# Altium PCB WIFI_BoardV4.10.PcbDoc (part 1 of 4)
Units mil, origin at the board's own origin, x right, y up, seen from the top; angles counter-clockwise.
Board outline 5550.17 x 2342.16 mil, 2 copper layers (Top Layer, Bottom Layer), stack 61.811 mil thick; 125 components, 90 nets, 434 pads, 155 vias.
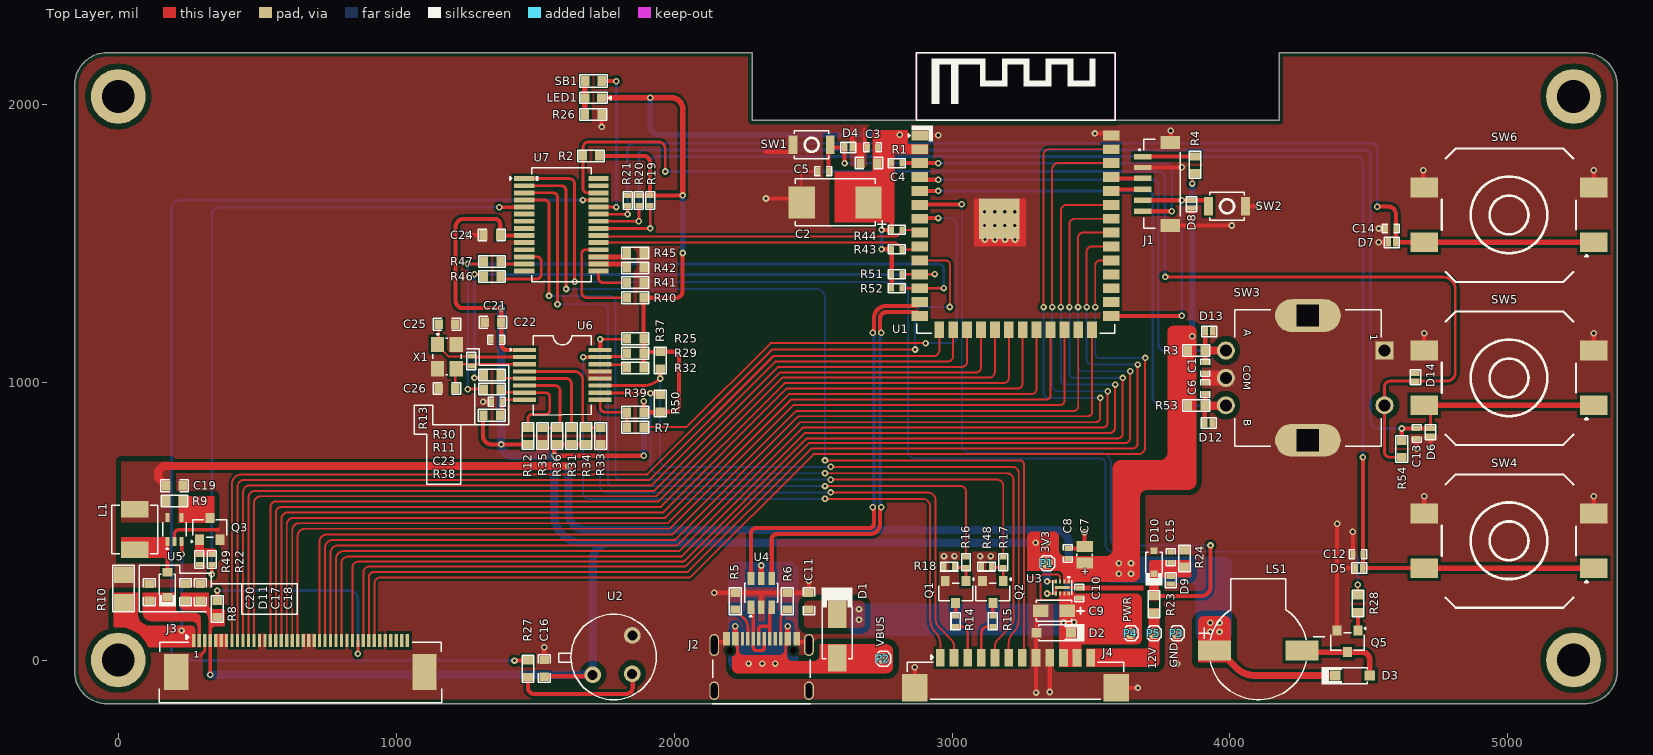
[diagram p0: Top Layer view]
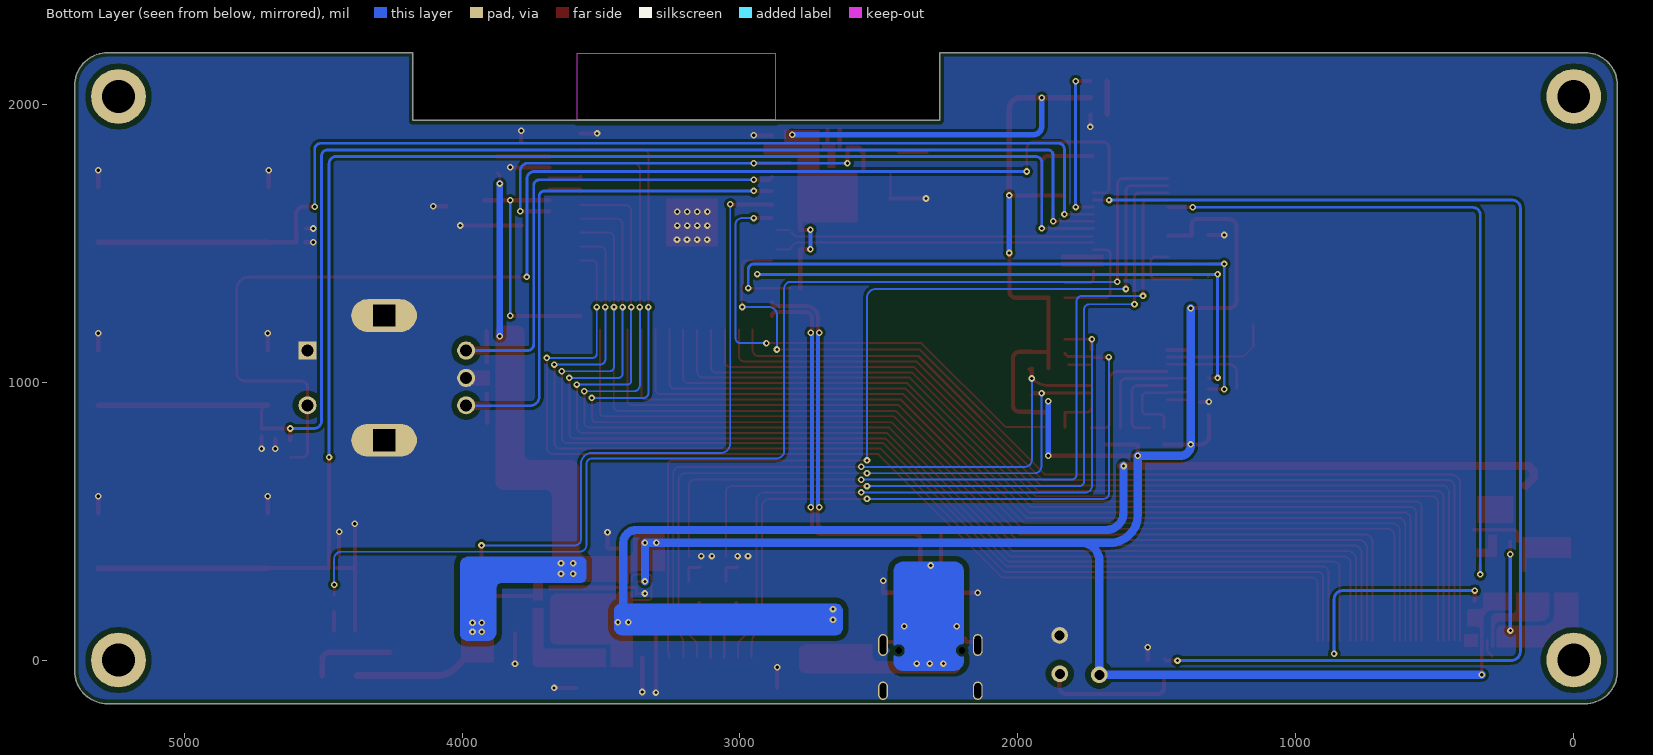
[diagram p1: Bottom Layer view, seen from below]
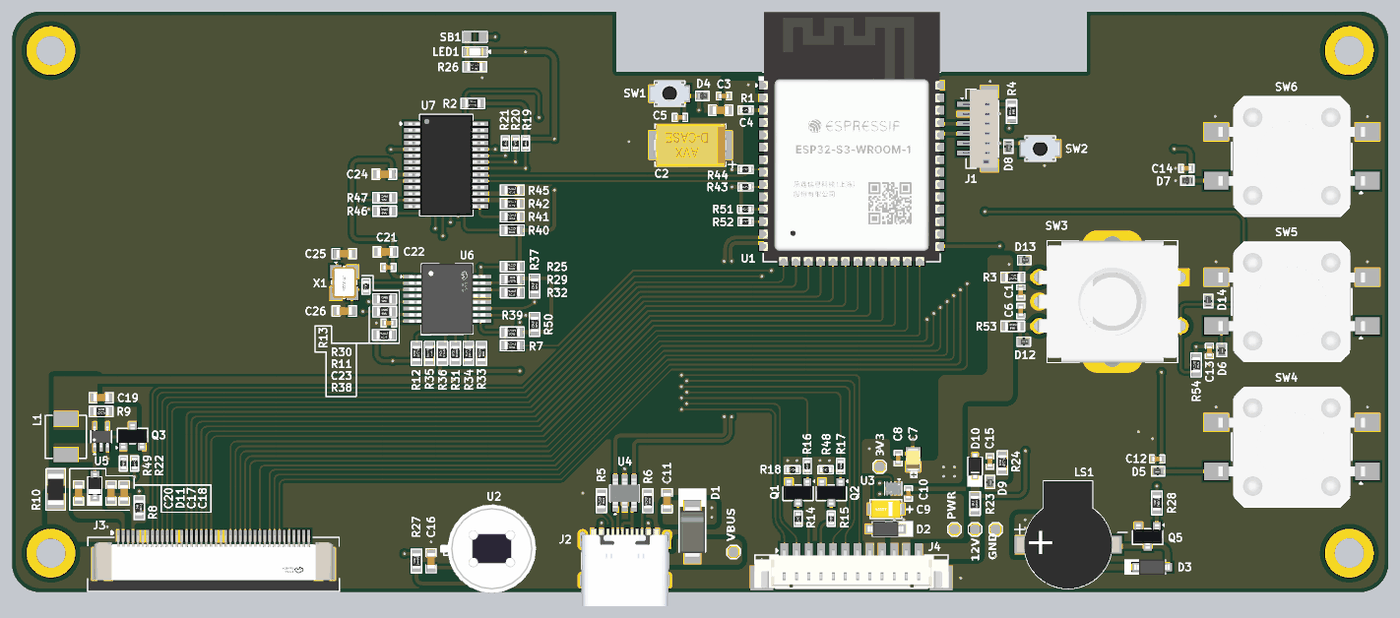
[diagram p3: 3D render of the assembled board from above, using the file's embedded part models]

## Layer stack, top to bottom
Top Solder: solder mask 0.394, Solder Resist, Dk 3.5
Top Layer: signal copper 1.378
Dielectric 1: dielectric 59.055, FR-4, Dk 4.6
Bottom Layer: signal copper 1.378
Bottom Solder: solder mask 0.394, Solder Resist, Dk 3.5

## Board outline
-156.47,-41.36 -156.47,2071.73 -156.47,2068.66 cw(c-40.09,2068.66) -40.09,2185.04 2280.48,2185.04 2280.48,1941.42 4177.38,1941.42 4177.38,2185.04 5275.59,2185.04 cw(c5275.59,2066.93) 5393.7,2066.93 5393.7,-39.63 cw(c5276.21,-39.63) 5276.21,-157.12 -40.71,-157.12 cw(c-40.71,-41.36)

## Design rules (kind name [scope] priority, off if disabled: settings)
BoardOutlineClearance [All] p1: gap=0 ignorepadtopadclearanceinfootprint=FALSE except(10: Arc-OutlineEdge; 15: Poly-OutlineEdge)
Clearance [All] p1: gap=10 ignorepadtopadclearanceinfootprint=FALSE except(4: SMDPad-SMDPad; 6: Arc-SMDPad Track-SMDPad SMDPad-Hole; 7: Arc-Arc Arc-Track Arc-Fill Arc-Region Track-Track Track-Via Track-Fill Track-Region Track-Text SMDPad-Fill SMDPad-Region THPad-THPad Via-Via Via-Region Fill-Fill Fill-Region Region-Region; 20: THPad-Poly Fill-Poly Poly-Poly Poly-Region)
ComponentClearance [All] p1: gap=0 collisioncheckmode=3 verticalgap=0 showdistances=FALSE
DiffPairsRouting Diff_USB [All] p1: maxlimit=7 minlimit=7 mostfreqgap=7 toplayer_minwidth=15 toplayer_maxwidth=15 toplayer_prefwidth=15 bottomlayer_minwidth=15 bottomlayer_maxwidth=15 bottomlayer_prefwidth=15 impedanceprofiledriven=TRUE impedanceprofileid={7E0B47CC-6290-4BF2-9677-D2EBC84C2973} impedanceprofilevalue=90.000000 maxuncoupledlength=500
HoleSize [All] p1: absolutevalues=TRUE maxlimit=137.8 minlimit=1 maxpercent=80.000 minpercent=20.000
MatchedLengths [InDifferentialPairClass('DIFF_485')] p1: tolerance=1000 checknetsindiffpair=TRUE checkdiffpairvsdiffpair=FALSE checkxsignals=FALSE checkothers=FALSE
MinimumSolderMaskSliver [All] p1: minsoldermaskwidth=0
PolygonConnect [All] p1: connectstyle=Direct reliefconductorwidth=10 reliefentries=4 polygonreliefangle="90 Angle" airgapwidth=10
RoutingVias [All] p1: holewidth=11.81 width=23.62 viastyle="Through Hole" minholewidth=7.87 minwidth=15.75 maxholewidth=23.62 maxwidth=39.37
SilkToSilkClearance [All] p1: silktosilkclearance=0
SilkToSolderMaskClearance [IsPad] p1: minsilkscreentomaskgap=0 clearancetoexposedcopper=TRUE
SolderMaskExpansion [All] p1: expansion=4 istentingtop=FALSE
SupplyNets "Schematic Supply Nets_5" [InNet('3V3_WIFI')] p1: voltage=0.000
SupplyNets "Schematic Supply Nets_3" [InNet('PWR')] p2: voltage=0.000
SupplyNets "Schematic Supply Nets_2" [InNet('U_VBUS')] p3: voltage=0.000
SupplyNets "Schematic Supply Nets_1" [InNet('VCC_12V')] p4: voltage=0.000
SupplyNets "Schematic Supply Nets_7" [InNet('GND')] p5: voltage=0.000
Width [All] p1: maxlimit=100 minlimit=4 preferedwidth=6 minimp=50.000000 maximp=50.000000 favimp=50.000000
24 further rules are at their usual default settings.

## Classes and differential pairs
component class IO_Expander_Sheet: C21 C22 C23 C24 C25 C26 J4 Q1 Q2 R11 R12 R13 R14 R15 R16 R17 R18 R25 R29 R30 R31 R32 R33 R34 R35 R36 R37 R38 R39 R40 R41 R42 R43 R44 R45 R46 R47 R48 R50 R51 R52 U6 U7 X1
differential pair class USB_PROG_LINES: TYPEC USBD
net class USB_PROG: TYPEC_N TYPEC_P
component class WiFI_Sheet: C1 C2 C3 C4 C5 C6 C7 C8 C9 C10 C11 C12 C13 C14 C15 C16 C17 C18 C19 C20 D1 D2 D3 D4 D5 D6 D7 D8 D9 D10 D11 D12 D13 D14 J1 J2 J3 L1 LED1 LS1 P1 P2 P3 P4 P5 Q3 Q5 R1 R2 R3 R4 R5 R6 R7 R8 R9 R10 R19 R20 R21 R22 R23 R24 R26 R27 R28 R49 R53 R54 SB1 SW1 SW2 SW3 SW4 SW5 SW6 U1 U2 U3 U4 U5
differential pair TYPEC: +TYPEC_P -TYPEC_N

## Components (designator, comment, footprint, x,y, rotation, side; value= is the part's Value field where it differs from the comment)
C1 "0.01uF" Cap-0402 3911.4,1051.47 r90 top
C2 "47uF" Case-D 2579.31,1646.42 r180 top
C3 "100nF" Cap-0402 2713.99,1844.53 r0 top
C4 "22uF" Cap-0603 2700.99,1787.71 r0 top
C5 "1uF" Cap-0402 2536.86,1758 r0 top
C6 "0.01uF" Cap-0402 3911.4,977.34 r270 top
C7 "22uF" Tant-0805 3476.96,378.14 r90 top
C8 "0.1uF" Cap-0402 3416.96,383.11 r270 top value=100nF
C9 "10uF" Case-A 3367.31,177.89 r180 top
C10 "0.1uF" Cap-0402 3457.99,240.84 r270 top value=100nF
C11 "100nF" Cap-0603 2485.04,211.75 r270 top
C12 "100nF" Cap-0402 4460.69,380.2 r0 top
C13 "100nF" Cap-0402 4671.9,815.22 r90 top
C14 "100nF" Cap-0402 4578.8,1552.55 r0 top
C15 "0.1uF" Cap-0402 3787.06,370.09 r270 top
C16 "0.1uF" Cap-0603 1532.99,-30.18 r90 top
C17 "4.7uF" Cap-0603 242.33,243.39 r270 top
C18 "100nF" Cap-0603 295.48,243.39 r270 top
C19 "4.7uF" Cap-0603 202.69,627.17 r180 top
C20 "1uF" Cap-0603 111.6,243.39 r270 top
C21 "1uF" Cap-0603 1348.34,1215.23 r0 top
C22 "0.1uF" Cap-0402 1360.34,1152.73 r0 top value=100nF
C23 "0.1uF" Cap-0402 1362.34,928.78 r0 top value=100nF
C24 "100nF" Cap-0603 1344.34,1529.24 r180 top
C25 "22pF" Cap-0603 1182.97,1208.23 r180 top
C26 "22pF" Cap-0603 1182.97,976.79 r0 top
D1 "SS24A" SMA 2586.76,85.89 r270 top
D2 "MMSZ5234B-7-F" SOD-123 3365.98,97.89 r0 top
D3 "1N4148W-7-F" SOD-123 4440.47,-56 r180 top value=2pF
D4 "LESD8D3.3CAT5G" "SOD-882 Bi Directional" 2627.21,1844.53 r180 top
D5 "LESD8D3.3CAT5G" "SOD-882 Bi Directional" 4464.69,330.55 r0 top
D6 "LESD8D3.3CAT5G" "SOD-882 Bi Directional" 4721.47,819.22 r90 top
D7 "LESD8D3.3CAT5G" "SOD-882 Bi Directional" 4582.8,1502.97 r0 top
D8 "LESD8D3.3CAT5G" "SOD-882 Bi Directional" 3861.48,1640.16 r90 top
D9 "LESD8D3.3CAT5G" "SOD-882 Bi Directional" 3787.06,287.32 r90 top
D10 "MM3Z3V3B" SOD323F 3726.76,351.44 r270 top
D11 "NSR0240HT1G" SOD-323 177.1,270.9 r90 top value=4pF
D12 "LESD8D3.3CAT5G" "SOD-882 Bi Directional" 3923.17,853 r180 top
D13 "LESD8D3.3CAT5G" "SOD-882 Bi Directional" 3925.17,1182.61 r180 top
D14 "LESD8D3.3CAT5G" "SOD-882 Bi Directional" 4667.01,1017.32 r270 top
J1 "Voltlink Target" "Voltlink Target" 3735.7,1713 r270 top
J2 "TYPE-C-31-M-12" TYPE-C-31-M-12_ 2314.76,-17.11 r0 top locked
J3 "AFC07-S40FCA-00" AFC07-S40FCA-00 655.85,13.27 r0 top
J4 "HC-1.25-12PLT" HC-1.25-12PLT 3228.53,-46.02 r0 top
L1 "4.7uH" MWSA0402S-4R7MT 60.05,469.54 r270 top
LED1 "ALS-PT19-315C/L177/TR8" ALS-PT19-315C/L177/TR_ 1709.89,2022.89 r180 top
LS1 "YS-SBZ9032C03R16" YS-SBZ9032C03R16_ 4102.03,34.13 r0 top
P1 "TEST POINT 0.5mm Dia" "Test-point - 0.5mm" 3341.88,348.79 r0 top
P2 "TEST POINT 0.5mm Dia" "Test-point - 0.5mm" 2752.99,4.74 r0 top
P3 "TEST POINT 0.5mm Dia" "Test-point - 0.5mm" 3809.51,95.89 r0 top
P4 "TEST POINT 0.5mm Dia" "Test-point - 0.5mm" 3643.99,95.89 r0 top
P5 "TEST POINT 0.5mm Dia" "Test-point - 0.5mm" 3726.75,95.89 r0 top
Q1 "BSS138" sot-23 3013.07,244.42 r180 top
Q2 "BSS138" SOT-23 3146.97,244.42 r180 top
Q3 "AO3400A" Sot-23 329.5,472.14 r0 top
Q5 "MMBT5551" SOT-23 4422.99,67.5 r180 top
R1 "10K" Res-0402 2801.49,1787.71 r180 top
R2 "10K" Res-0603 1701.41,1814 r180 top value=10kR
R3 "10K" Res-0603 3878.83,1113.4 r180 top value=10kR
R4 "0R" Res-0603 3874.4,1781.9 r90 top
R5 "5.1K" Res-0603 2220.28,211.75 r90 top
R6 "5.1K" Res-0603 2407.35,211.75 r90 top
R7 "0R" Res-0603 1860.52,837.67 r0 top
R8 "10K" Res-0603 356.55,183.39 r270 top
R9 "10K" Res-0603 202.69,571.9 r180 top
R10 "6.2R" Res-1206 19.6,257.11 r270 top
R11 "0R" Res-0603 1345.34,974.7 r0 top
R12 "DNP" Res-0603 1474.75,805.76 r270 top
R13 "1M" Res-0402 1270.47,1075.78 r270 top value=1MR
R14 "100R" Res-0402 3013.07,139.3 r270 top
R15 "0R" Res-0402 3146.97,139.3 r270 top
R16 "1K" Res-0402 3050.47,351.44 r90 top
R17 "1K" Res-0402 3184.37,351.44 r90 top
R18 "47K" Res-0402 2990.17,336.44 r0 top
R19 "10K" Res-0402 1914,1653 r90 top
R20 "10K" Res-0402 1873.41,1653 r90 top
R21 "10K" Res-0402 1832.82,1653 r90 top
R22 "4.7K" Res-0402 337.09,361.99 r270 top
R23 "15K" Res-0603 3726.76,200.51 r270 top value=15kR
R24 "3.3K" Res-0603 3836.92,365.09 r270 top
R25 "10K" Res-0603 1860.52,1156.23 r0 top value=10kR
R26 "4.7K" Res-0603 1709.41,1962.89 r0 top
R27 "20K" Res-0603 1474.35,-31.34 r270 top
R28 "4.7K" Res-0603 4460.39,202.89 r270 top
R29 "100K" Res-0603 1860.52,1103.72 r180 top value=100kR
R30 "0R" Res-0603 1345.34,1025.76 r0 top
R31 "DNP" Res-0603 1631.06,805.76 r270 top
R32 "10K" Res-0603 1860.53,1051.21 r0 top value=10kR
R33 "0R" Res-0603 1736.19,805.76 r90 top
R34 "0R" Res-0603 1683.53,805.76 r270 top
R35 "0R" Res-0603 1526.73,805.76 r90 top
R36 "0R" Res-0603 1579.03,805.76 r270 top
R37 "10K" Res-0603 1950,1078.21 r90 top value=10kR
R38 "10K" Res-0603 1344.33,880.55 r0 top value=10kR
R39 "5.1K" Res-0603 1860.53,891.38 r0 top
R40 "10K" Res-0603 1860.53,1303.23 r0 top
R41 "10K" Res-0603 1860.53,1357.72 r0 top
R42 "10K" Res-0603 1860.53,1411.04 r0 top
R43 "4.7K" Res-0402 2801.49,1477.71 r180 top
R44 "4.7K" Res-0402 2801.49,1547.72 r180 top
R45 "10K" Res-0603 1860.53,1464.37 r0 top
R46 "0R" Res-0603 1345.34,1380 r0 top
R47 "0R" Res-0603 1345.34,1434.15 r0 top
R48 "47K" Res-0402 3124.07,336.44 r0 top
R49 "100K" Res-0402 292.09,361.99 r90 top
R50 "DNP" Res-0603 1950,923.38 r90 top value=100kR
R51 "4.7K" Res-0402 2801.01,1387.71 r180 top
R52 "4.7K" Res-0402 2801.49,1337.71 r180 top
R53 "10K" Res-0603 3878.83,915.5 r0 top value=10kR
R54 "DNP" Res-0603 4618.07,759.5 r90 top
SB1 "Solder Bridge 0603" "Solder Bridge" 1710.37,2082.89 r180 top
SW1 "B3U-1000P" B3U-1000P 2495.06,1853.8 r180 top
SW2 "B3U-1000P" B3U-1000P 3989.6,1632.53 r0 top
SW3 "PEC11R-4215F-S0024" PEC11R-4215F-S0024 4280.58,1014.97 r270 top
SW4 "TL3300CF160Q" TL3300CF160Q. 5004.1,428.97 r180 top
SW5 "TL3300CF160Q" TL3300CF160Q. 5004.1,1015.19 r180 top
SW6 "TL3300CF160Q" TL3300CF160Q. 5004.1,1601.4 r180 top
U1 "ESP32-S3-WROOM-1-N16R8" "41-SMD Module" 3229.12,1538.11 r0 top locked
U2 "AS312" AS312 1812.99,-16.8 r45 top
U3 "LD56100DPU33R" DFN-8(1.2x1.6) 3396.62,260.84 r270 top
U4 "USBLC6-2SC6" SOT-23-6 2313.79,241.97 r90 top
U5 "TPS61169DCKR" SC70-5 202.69,469.58 r90 top
U6 "WK2132-ISSG" SSOP-16-208mil 1598.34,1025.76 r0 top
U7 "MCP23017T-E/SS" SSOP-28-208mil 1594.49,1565.75 r0 top
X1 "14.7456MHz" SMD3225-4P 1182.97,1091.84 r270 top

## Footprints (in the part's own frame and the unit in brackets; to place one, negate y for a bottom-side part, rotate by r counter-clockwise, add the part's x,y. Pads: shape width x height; smd on the part's side, far side on the other; paste and mask are expansions set on the pad)
"41-SMD Module" [mm]
  rect 1.5x0.9 smd: 1(-8.75,8.88) 2(-8.75,7.61) 3(-8.75,6.34) 4(-8.75,5.07) 5(-8.75,3.8) 6(-8.75,2.53) 7(-8.75,1.26) 8(-8.75,-0.01) 9(-8.75,-1.28) 10(-8.75,-2.55) 11(-8.75,-3.82) 12(-8.75,-5.09) 13(-8.75,-6.36) 14(-8.75,-7.63) 27(8.75,-7.63) 28(8.75,-6.36) 29(8.75,-5.09) 30(8.75,-3.82) 31(8.75,-2.55) 32(8.75,-1.28) 33(8.75,-0.01) 34(8.75,1.26) 35(8.75,2.53) 36(8.75,3.8) 37(8.75,5.07) 38(8.75,6.34) 39(8.75,7.61) 40(8.75,8.88)
  rect 0.9x1.5 smd: 15(-6.98,-8.88) 16(-5.71,-8.88) 17(-4.44,-8.88) 18(-3.17,-8.88) 19(-1.9,-8.88) 20(-0.63,-8.88) 21(0.64,-8.88) 22(1.91,-8.88) 23(3.18,-8.88) 24(4.45,-8.88) 25(5.72,-8.88) 26(6.99,-8.88)
  rect 3.7x3.7 smd: 41(-1.5,1.26)
  Keep-Out Layer region: -9.042,10.287 9.042,10.287 9.042,16.383 -9.042,16.383
  silkscreen extent -9.8,-9.2 9.09,16.43, body extent -9.01,-9.14 9.01,16.37, height 3.16
AFC07-S40FCA-00 [mm]
  rect 0.3x1.2 smd: 1(-9.751,1.443) 2(-9.252,1.443) 3(-8.753,1.443) 4(-8.252,1.443) 5(-7.752,1.443) 6(-7.252,1.443) 7(-6.751,1.443) 8(-6.251,1.443) 9(-5.753,1.443) 10(-5.253,1.443) 11(-4.752,1.443) 12(-4.252,1.443) 13(-3.752,1.443) 14(-3.251,1.443) 15(-2.752,1.443) 16(-2.253,1.443) 17(-1.753,1.443) 18(-1.252,1.443) 19(-0.752,1.443) 20(-0.251,1.443) 21(0.249,1.443) 22(0.748,1.443) 23(1.247,1.443) 24(1.748,1.443) 25(2.248,1.443) 26(2.748,1.443) 27(3.249,1.443) 28(3.749,1.443) 29(4.247,1.443) 30(4.747,1.443) 31(5.248,1.443) 32(5.748,1.443) 33(6.248,1.443) 34(6.749,1.443) 35(7.248,1.443) 36(7.747,1.443) 37(8.247,1.443) 38(8.748,1.443) 39(9.248,1.443) 40(9.749,1.443)
  rect 2.2x3.3 smd: MP1(-11.35,-1.443) MP2(11.35,-1.443)
  silkscreen extent -12.9,-4.25 12.9,1.91, body extent -12.8,-4.17 12.8,1.58, height 2.01
ALS-PT19-315C/L177/TR_ [mm]
  rect 0.82x0.82 smd: 1(-0.75,0) 2(0.75,0)
  silkscreen extent -1.57,-0.51 1.27,0.51, body extent -0.85,-0.4 0.85,0.4, height 0.6
AS312 [mil]
  round 60 hole 36 paste-99999 mask+2: 1(-100.4,48.95) 2(2.6,-48.95) 3(100.4,48.35)
  silkscreen extent -156,-113 152,195, body extent -179,-130 179,228, height 177
B3U-1000P [mm] "SWITCH TACTILE SPST-NO 0.05A 12V"
  rect 0.82x1.72 smd: 1(-1.7,0) 2(1.7,0)
  silkscreen extent -1.57,-1.3 1.57,1.3, body extent -2,-1.26 2,1.24, height 1.6
Cap-0402 [mil]
  rect 18x25 smd mask+2.36: 1(-18.5,0) 2(18.5,0)
  silkscreen extent -31,-16 31,16, body extent -20,-10 20,10, height 19
Cap-0603 [mil]
  rect 30x35 smd mask+2.36: 1(-30,0) 2(30,0)
  silkscreen extent -49,-21 49,21, body extent -32,-16 31,16, height 34
Case-A [mm]
  rect 1.42x1.13 smd: 1(-1.2,0) 2(1.2,0)
  silkscreen extent -2.72,-0.97 1.63,0.97, body extent -1.6,-0.9 1.6,0.9, height 1.8
Case-D [mm]
  rect 2.4x2.9 smd: 1(-3.05,0) 2(3.05,0)
  silkscreen extent -4.7,-2.15 3.65,2.39, body extent -3.7,-2.22 3.7,2.22, height 3.01
DFN-8(1.2x1.6) [mm]
  rect 0.345x0.2 smd paste+0 mask+0.051: 1(-0.547,0.6) 2(-0.547,0.2) 3(-0.547,-0.2) 4(-0.547,-0.6) 5(0.547,-0.6) 6(0.547,-0.2) 7(0.547,0.2) 8(0.547,0.6)
  rect 0.3x1.3 smd paste+0 mask+0.051: 9(0,0)
  silkscreen extent -0.98,-0.88 0.68,0.88, body extent -0.61,-0.81 0.61,0.81, height 0.4
HC-1.25-12PLT [mm]
  rect 0.8x1.62 smd paste+0 mask+0.05: 1(-6.875,1.38) 2(-5.625,1.38) 3(-4.375,1.38) 4(-3.125,1.38) 5(-1.875,1.38) 6(-0.625,1.38) 7(0.625,1.38) 8(1.875,1.38) 9(3.125,1.38) 10(4.375,1.38) 11(5.625,1.38) 12(6.875,1.38)
  rect 2.35x2.5 smd paste+0 mask+0.05: MP1(-9.2,-1.38) MP2(9.2,-1.38)
  silkscreen extent -9.91,-2.42 9.91,1.66, body extent -9.97,-2.38 9.97,1.52, height 4.75
MWSA0402S-4R7MT [mm]
  rect 1.5x2.5 smd: 1(-1.85,0) 2(1.85,0)
  silkscreen extent -2.2,-2.1 2.2,2.1
PEC11R-4215F-S0024 [mm]
  rect 1.65x1.65 hole 1.1: 1(-2.5,7)
  round 1.65 hole 1.1: 2(2.5,7) A(-2.5,-7.5) B(2.5,-7.5) COM(0,-7.5)
  oval 3x6 hole 2 square: S1(-5.7,0) S2(5.7,0)
  silkscreen extent -6.25,-6.7 6.25,6.7, body extent -6.93,-7.6 6.93,7.1, height 21.5
Res-0402 [mil]
  rect 18x25 smd mask+2.17: 1(-18.5,0) 2(18.5,0)
  silkscreen extent -32,-17 32,16, body extent -23,-11 23,11, height 16
Res-0603 [mil]
  rect 30x35 smd: 1(-30,0) 2(30,0)
  silkscreen extent -48,-21 48,21, body extent -31,-17 31,17, height 18
Res-1206 [mil]
  rect 60x70 smd: 1(-50,0) 2(50,0)
  silkscreen extent -84,-39 84,39, body extent -63,-31 63,31, height 24
SC70-5 [mm]
  rect 0.85x0.35 smd: 1(-1.1,0.65) 2(-1.1,0) 3(-1.1,-0.65) 4(1.1,-0.65) 5(1.1,0.65)
  silkscreen extent -1.8,-1.07 0.64,1.07, body extent -1.05,-1 1.05,1, height 1.1
SMA [mm]
  rect 2.5x1.7 smd: 1(-2,0) 2(2,0)
  silkscreen extent -4.45,-1.42 2.06,1.42, body extent -2.6,-1.3 2.6,1.3, height 2.4
SMD3225-4P [mm]
  rect 1.4x1.2 smd: 1(-1.1,-0.85) 2(1.1,-0.85) 3(1.1,0.85) 4(-1.1,0.85)
  silkscreen extent -2.08,-1.3 1.65,1.3, body extent -1.6,-1.25 1.6,1.25, height 0.81
SOD323F [mm]
  rect 0.6x0.6 smd: 1(-1.05,0) 2(1.05,0)
  silkscreen extent -0.91,-0.79 2.11,0.79, body extent -1.25,-0.68 1.25,0.68, height 1
SOD-123 [mm]
  rect 0.95x0.9 smd: 1(-1.575,0) 2(1.575,0)
  silkscreen extent -1.37,-0.8 2.82,0.8, body extent -1.82,-0.78 1.83,0.78, height 1.5
SOD-323 [mm]
  rect 0.8x0.9 smd mask+0.055: 1(-1.15,0) 2(1.15,0)
  silkscreen extent -2.01,-0.79 0.94,0.79, body extent -1.3,-0.67 1.3,0.67, height 1.1
"SOD-882 Bi Directional" [mm]
  rect 0.5x0.8 smd mask+0.055: 1(-0.35,0) 2(0.35,0)
  silkscreen extent -0.69,-0.48 0.69,0.48, body extent -0.49,-0.29 0.49,0.29, height 0.48
"Solder Bridge" [mil] "Solder Bridge ON"
  rect 30x35 smd: 1(-30,0) 2(30,0)
  silkscreen extent -50,-22 50,22
sot-23 [mm] "TRANS NPN 40V 0.6A SOT23"
  rect 0.82x0.92 smd: 1(-0.95,-1) 2(0.95,-1) 3(0,1)
  silkscreen extent -1.68,-1.3 1.55,0.81, body extent -1.5,-1.25 1.5,1.25, height 1.05
SOT-23 [mm] "TRANS NPN 40V 0.6A SOT23"
  rect 0.82x0.92 smd: 1(-0.95,-1) 2(0.95,-1) 3(0,1)
  silkscreen extent -1.68,-1.3 1.55,0.81, body extent -1.5,-1.25 1.5,1.25, height 1.05
Sot-23 [mm] "TRANS NPN 40V 0.6A SOT23"
  rect 0.82x0.92 smd: 1(-0.95,-1) 2(0.95,-1) 3(0,1)
  silkscreen extent -1.68,-1.3 1.55,0.81, body extent -1.5,-1.25 1.5,1.25, height 1.05
SOT-23-6 [mm]
  rect 1.22x0.62 smd: 1(-1.31,0.95) 2(-1.31,0) 3(-1.31,-0.95) 4(1.31,-0.95) 5(1.31,0) 6(1.31,0.95)
  silkscreen extent -2.18,-1.52 0.86,1.52, body extent -1.5,-1.5 1.5,1.5, height 1.47
SSOP-16-208mil [mm]
  rect 2.1x0.38 smd paste+0 mask+0.051: 1(-3.45,2.275) 2(-3.45,1.625) 3(-3.45,0.975) 4(-3.45,0.325) 5(-3.45,-0.325) 6(-3.45,-0.975) 7(-3.45,-1.625) 8(-3.45,-2.275) 9(3.45,-2.275) 10(3.45,-1.625) 11(3.45,-0.975) 12(3.45,-0.325) 13(3.45,0.325) 14(3.45,0.975) 15(3.45,1.625) 16(3.45,2.275)
  silkscreen extent -4.75,-3.68 2.65,3.6, body extent -3.9,-3.6 3.9,3.6, height 2.2
SSOP-28-208mil [mm]
  rect 1.85x0.45 smd: 1(-3.4,4.225) 2(-3.4,3.575) 3(-3.4,2.925) 4(-3.4,2.275) 5(-3.4,1.625) 6(-3.4,0.975) 7(-3.4,0.325) 8(-3.4,-0.325) 9(-3.4,-0.975) 10(-3.4,-1.625) 11(-3.4,-2.275) 12(-3.4,-2.925) 13(-3.4,-3.575) 14(-3.4,-4.225) 15(3.4,-4.225) 16(3.4,-3.575) 17(3.4,-2.925) 18(3.4,-2.275) 19(3.4,-1.625) 20(3.4,-0.975) 21(3.4,-0.325) 22(3.4,0.325) 23(3.4,0.975) 24(3.4,1.625) 25(3.4,2.275) 26(3.4,2.925) 27(3.4,3.575) 28(3.4,4.225)
  silkscreen extent -4.7,-5.21 2.72,5.21, body extent -3.88,-5.17 3.88,5.17, height 2.15
Tant-0805 [mm]
  rect 1x1.5 smd: 1(-0.75,0) 2(0.75,0)
  silkscreen extent -0.1,-0.7 0.1,0.7, body extent -1.1,-0.72 1.1,0.72, height 1.24
"Test-point - 0.5mm" [mm]
  oct 1x1 smd: 1(0,0)
  silkscreen extent -0.68,-0.68 0.68,0.68
TL3300CF160Q. [mm] "SWITCH TACTILE SPST-NO 0.05A 12V"
  rect 2.5x1.8 smd: 1(-7.75,2.5) 2(7.75,2.5) 3(-7.75,-2.5) 4(7.75,-2.5)
  silkscreen extent -7.21,-6.07 6.15,6.12, body extent -7.5,-5.98 7.5,6.02, height 8.77
TYPE-C-31-M-12_ [mm]
  rect 0.6x1.2 smd: A1/B12(-3.2,2.375) A4/B9(-2.4,2.375) B1/A12(3.2,2.375) B4/A9(2.4,2.375)
  rect 0.3x1.2 smd: A5(-1.25,2.375) A6(-0.25,2.375) A7(0.25,2.375) A8(1.25,2.375) B5(1.75,2.375) B6(0.75,2.375) B7(-0.75,2.375) B8(-1.75,2.375)
  round 0 hole 0.62 unplated: MH(-2.89,1.305) MH(2.89,1.305)
  oval 0.9x2 hole 0.6 slot 1.7 at 90 deg: S1(4.325,1.805) S4(-4.325,1.805)
  oval 0.9x1.7 hole 0.6 slot 1.4 at 90 deg: S2(4.325,-2.375) S3(-4.325,-2.375)
  silkscreen extent -4.5,-3.57 4.5,0.44, body extent -4.47,-5.01 4.47,2.89, height 3.31
"Voltlink Target" [mm]
  rect 0.5x1.6 smd: 1(-2.5,-1.262) 2(-1.5,-1.262) 3(-0.5,-1.262) 4(0.5,-1.262) 5(1.5,-1.262) 6(2.5,-1.262)
  rect 1.2x1.8 smd: MP1(-3.8,1.262) MP2(3.8,1.262)
  silkscreen extent -4.06,-1.68 4.06,2.17, body extent -4,-1.49 4,2.11, height 4.25
YS-SBZ9032C03R16_ [mm] "NO 2700Hz 85dB @ 3V, 10cm 3V F9mm SMD,9x3.2mm Buzzers RoHS"
  rect 3x1.8 smd: 1(-4,0) 2(4,0)
  silkscreen extent -5.46,-4.5 6.06,6.54, body extent -5.25,-4.5 5.25,6.5, height 3.3

## Part data
C1 C6: library part CC0402KRX5R8BB103, "CAP CER 10000PF 25V X5R 0402", LCSC Part Number=C576726, Manufacturer=Yageo, Supplier Part Number 1=2101932, Category="Ceramic Capacitors", ComponentLink1Description=LCSC, ComponentLink1URL=https://www.lcsc.com/product-detail/Multilayer-Ceramic-Capacitors-MLCC-SMD-SMT_YAGEO-CC0402KRX5R8BB103_C576726.html, Item Type=Capacitor, Manufacturer Part Number=CC0402KRX5R8BB103, Pricing 1="10000=0.00290, 40000=0.00270, 150000=0.00260, 250000=0.00250, 500000=0.00240 (USD)", RoHS=Yes, RoHS Compliant=Yes, Stock 1=140000, Supplier 1="Future Electronics"
C2: library part T495D476K025ATE250, "CAP TANT 47UF 10% 25V 2917", LCSC Part Number=C1952924, Manufacturer=KEMET, ComponentLink1Description=http://www.mouser.com/ds/2/212/KEM_T2071_T495_COTS-1104607.pdf?src-supplier=Mouser, ComponentLink1URL=http://www.mouser.com/ds/2/212/KEM_T2071_T495_COTS-1104607.pdf?src-supplier=Mouser, ComponentLink2Description=http://components.arrow.com/part/dataview/43511451S7939771N7429?src-supplier=Arrow+Electronics, ComponentLink2URL=http://components.arrow.com/part/dataview/43511451S7939771N7429?src-supplier=Arrow+Electronics, ComponentLink3Description=https://datasheet.octopart.com/T495D476K025ATE250-Kemet-datasheet-27203288.pdf?src-supplier=Element14, ComponentLink3URL=https://datasheet.octopart.com/T495D476K025ATE250-Kemet-datasheet-27203288.pdf?src-supplier=Element14, ComponentLink4Description=https://datasheet.octopart.com/T495D476K025ATE250-Kemet-datasheet-9873475.pdf?src-supplier=Newark, ComponentLink4URL=https://datasheet.octopart.com/T495D476K025ATE250-Kemet-datasheet-9873475.pdf?src-supplier=Newark, ComponentLink5Description=http://www.kemet.com/Lists/ProductCatalog/Attachments/261/KEM_T2009_T495.pdf?src-supplier=Avnet, ComponentLink5URL=http://www.kemet.com/Lists/ProductCatalog/Attachments/261/KEM_T2009_T495.pdf?src-supplier=Avnet, ComponentLink6Description=https://api.kemet.com/component-edge/download/datasheet/T495D476K025ATE250.pdf?src-supplier=Digikey, ComponentLink6URL=https://api.kemet.com/component-edge/download/datasheet/T495D476K025ATE250.pdf?src-supplier=Digikey, ComponentLink7Description=https://datasheet.octopart.com/T495D476K025ATE250-KEMET-datasheet-102476631.pdf?src-supplier=Farnell, ComponentLink7URL=https://datasheet.octopart.com/T495D476K025ATE250-KEMET-datasheet-102476631.pdf?src-supplier=Farnell, ComponentLink8Description=https://datasheet.octopart.com/T495D476K025ATE250-KEMET-datasheet-130110683.pdf?src-supplier=TME, ComponentLink8URL=https://datasheet.octopart.com/T495D476K025ATE250-KEMET-datasheet-130110683.pdf?src-supplier=TME, Item Type=Capacitor, Manufacturer Part Number=T495D476K025ATE250, Pricing="1=1.82, 10=1.29, 50=1.29, 100=1.07, 1000=0.751, 10000=0.67 (USD)", RoHS=Yes, Stock=2198, Supplier=Mouser
C3 C12 C13 C14: library part CC0402KRX5R8BB104, "CAP CER 0.1UF 25V X5R 0402", Case Code (Imperial)=0402, Case Code (Metric)=1005, Dielectric=X5R, LCSC Part Number=C106256, Manufacturer=Yageo, Max Operating Temperature=85°C, Min Operating Temperature=-55°C, Resistor Type=Ceramic, Supplier Part Number 1=311-1697-1-ND, Tolerance=10%, Voltage Rating=25V, Capacitance=100nF, Case/Package=0402, Category="Ceramic Capacitors", ComponentLink1Description=http://www.mouser.com/ds/2/447/UPY-GPHC_X5R_4V-to-50V_25-1131599.pdf?src-supplier=Mouser, ComponentLink1URL=http://www.mouser.com/ds/2/447/UPY-GPHC_X5R_4V-to-50V_25-1131599.pdf?src-supplier=Mouser, ComponentLink2Description=http://www.yageo.com/documents/recent/UPY-GPHC_X5R_4V-to-50V-16.pdf?src-supplier=Future+Electronics, ComponentLink2URL=http://www.yageo.com/documents/recent/UPY-GPHC_X5R_4V-to-50V-16.pdf?src-supplier=Future+Electronics, ComponentLink3Description=http://www.yageo.com/documents/recent/UPY-GPHC_X5R_4V-to-50V_25.pdf?src-supplier=Digi-Key, ComponentLink3URL=http://www.yageo.com/documents/recent/UPY-GPHC_X5R_4V-to-50V_25.pdf?src-supplier=Digi-Key, Depth=0.5mm, Halogen Free="Halogen Free", Item Type=Capacitor, Lead Free="Lead Free", Length=0.039inch, Manufacturer Part Number=CC0402KRX5R8BB104, Mount="Surface Mount", Packaging="Tape and Reel", Pricing 1="1=0.10000, 10=0.03800, 50=0.02100, 100=0.01710, 500=0.01224, 1000=0.00961, 2500=0.00874, 5000=0.00804 (USD)", RoHS=Yes, RoHS Compliant=Yes, Series=CC, Stock 1=4598218, Supplier 1=Digi-Key, Thickness=0.022inch, Voltage Rating (DC)=25V, Width=0.02inch
C4: library part CC0603MRX5R6BB226, "CAP CER 22UF 10V X5R 0603", Case Code (Imperial)=0603, Case Code (Metric)=1608, Dielectric=X5R, LCSC Part Number=C109447, Manufacturer=Yageo, Max Operating Temperature=85°C, Min Operating Temperature=-55°C, Package Quantity=4000, Supplier Part Number 1=311-1819-1-ND, Tolerance=20%, Voltage Rating=10V, Capacitance=22uF, Case/Package=0603, Category="Ceramic Capacitors", ComponentLink1Description=http://www.mouser.com/ds/2/447/Yageo_UPY-GP_NP0_16V-to-50V_9-358835.pdf?src-supplier=Mouser, ComponentLink1URL=http://www.mouser.com/ds/2/447/Yageo_UPY-GP_NP0_16V-to-50V_9-358835.pdf?src-supplier=Mouser, ComponentLink2Description=http://www.yageo.com/documents/recent/UPY-GPHC_X5R_4V-to-50V_25.pdf?src-supplier=Digi-Key, ComponentLink2URL=http://www.yageo.com/documents/recent/UPY-GPHC_X5R_4V-to-50V_25.pdf?src-supplier=Digi-Key, Halogen Free="Halogen Free", Height=0.8mm, Item Type=Capacitor, Lead Free="Lead Free", Length=0.063inch, Manufacturer Part Number=CC0603MRX5R6BB226, Mount="Surface Mount", Packaging="Tape and Reel", Pricing 1="1=0.68000, 10=0.48000, 50=0.36300, 100=0.31610, 500=0.23416, 1000=0.19903 (USD)", RoHS=Yes, RoHS Compliant=Yes, Stock 1=19628, Supplier 1=Digi-Key, Termination=SMD/SMT, Thickness=0.035inch, Voltage Rating (DC)=10V, Weight=7.1E-05oz, Width=0.8mm
C5: library part GRM155C71C105KE11D, "CAP CER 1UF 16V X7S 0402", Case/Package=343Case, Dielectric=1542DielectricType, LCSC Part Number=C576449, Manufacturer=Murata, Max Operating Temperature=125°C, Min Operating Temperature=-55°C, Tolerance=10%, Voltage Rating=16V, Height=600um, Item Type=Capacitors, Length=1mm, Manufacturer Part Number=GRM155C71C105KE11D, Material=4241ConductorMaterial, Pricing="1=0.11, 10=0.041, 50=0.041, 100=0.026, 1000=0.023, 10000=0.016 (USD)", RoHS=No, Stock=16102, Supplier=Mouser, Thickness=500um, Voltage Rating (DC)=16V, Width=500um
C7: library part TCTP1A226M8R, "22uF 10V 5Ω ±20% 0805 Tantalum Capacitors ROHS", LCSC Part Number=C2859526, Manufacturer=Rohm, Package=0805, ComponentLink1Description=LCSC, ComponentLink1URL=https://www.lcsc.com/product-detail/Tantalum-Capacitors_ROHM-Semicon-TCTP1A226M8R_C2859526.html, Item Type=Capacitor, Manufacturer Part Number=TCTP1A226M8R
C8 C10 C22 C23: library part CC0402JRX7R7BB104, "CAP CER 0.1UF 16V X7R 0402", Case Code (Imperial)=0402, Case Code (Metric)=1005, Dielectric=X7R, LCSC Part Number=C541464, Manufacturer=Yageo, Max Operating Temperature=125°C, Min Operating Temperature=-55°C, Package Quantity=10000, Supplier Part Number=311-1676-1-ND, Tolerance=5%, Voltage Rating=16V, Case/Package=0402, Category="Ceramic Capacitors", ComponentLink1Description=https://datasheet.ciiva.com/13210/upy-gphc-x7r-6-3v-to-50v-8-12304-13210152.pdf?src-supplier=Mouser, ComponentLink1URL=https://datasheet.ciiva.com/13210/upy-gphc-x7r-6-3v-to-50v-8-12304-13210152.pdf?src-supplier=Mouser, Construction=Flat, Halogen Free="Halogen Free", Height=0.5mm, Item Type=Capacitor, Lead Free="Lead Free", Length=0.039inch, Manufacturer Part Number=CC0402JRX7R7BB104, Material=4241ConductorMaterial, Mounting Technology="Surface Mount", Packaging="Tape and Reel", Pricing="1=0.1, 10=0.046, 50=0.0262, 100=0.0203, 500=0.01528, 1000=0.012, 2500=0.01091, 5000=0.01004 (USD)", RoHS=Yes, RoHS Compliant=Yes, Series=CC, Stock=1659111, Supplier=Digikey, Thickness=0.022inch, Voltage Rating (DC)=16V, Width=0.02inch
C9: library part T491A106K016AT, "CAP TANT 10UF 10% 16V 1206", LCSC Part Number=C110055, Manufacturer=KEMET, Supplier Part Number 1=80-T491A106K016, Category="Tantalum Capacitors", ComponentLink1Description=https://datasheet.ciiva.com/34302/1573257-34302505.pdf?src-supplier=Jameco, ComponentLink1URL=https://datasheet.ciiva.com/34302/1573257-34302505.pdf?src-supplier=Jameco, ComponentLink2Description=https://datasheet.ciiva.com/7696/1732745-7696294.pdf?src-supplier=Element14, ComponentLink2URL=https://datasheet.ciiva.com/7696/1732745-7696294.pdf?src-supplier=Element14, ComponentLink3Description=https://datasheet.ciiva.com/12882/kem-t2005-t491-12882730.pdf?src-supplier=Mouser, ComponentLink3URL=https://datasheet.ciiva.com/12882/kem-t2005-t491-12882730.pdf?src-supplier=Mouser, ComponentLink4Description=https://datasheet.ciiva.com/6248/kem-t2005-t491-6248087.pdf?src-supplier=Digi-Key, ComponentLink4URL=https://datasheet.ciiva.com/6248/kem-t2005-t491-6248087.pdf?src-supplier=Digi-Key, ComponentLink5Description=https://datasheet.ciiva.com/6248/kem-t2005-t491-6248088.pdf?src-supplier=Digi-Key, ComponentLink5URL=https://datasheet.ciiva.com/6248/kem-t2005-t491-6248088.pdf?src-supplier=Digi-Key, ComponentLink6Description=https://datasheet.ciiva.com/6248/kem-t2005-t491-6248089.pdf?src-supplier=Digi-Key, ComponentLink6URL=https://datasheet.ciiva.com/6248/kem-t2005-t491-6248089.pdf?src-supplier=Digi-Key, ComponentLink7Description=https://datasheet.ciiva.com/14113/t491serie-eng-tds-14113132.pdf?src-supplier=Distrelec, ComponentLink7URL=https://datasheet.ciiva.com/14113/t491serie-eng-tds-14113132.pdf?src-supplier=Distrelec, ComponentLink8Description=https://datasheet.ciiva.com/14605/70095774-14605543.pdf?src-supplier=Allied+Electronics, ComponentLink8URL=https://datasheet.ciiva.com/14605/70095774-14605543.pdf?src-supplier=Allied+Electronics, ComponentLink9Description=https://datasheet.ciiva.com/14586/70095774-14586694.pdf?src-supplier=Allied+Electronics, ComponentLink9URL=https://datasheet.ciiva.com/14586/70095774-14586694.pdf?src-supplier=Allied+Electronics, ComponentLink10Description=https://datasheet.ciiva.com/39123/kem-t2005-t491-39123278.pdf?src-supplier=Onlinecomponents.com, ComponentLink10URL=https://datasheet.ciiva.com/39123/kem-t2005-t491-39123278.pdf?src-supplier=Onlinecomponents.com, ComponentLink11Description=https://datasheet.ciiva.com/7696/1854511-7696293.pdf?src-supplier=Element14, ComponentLink11URL=https://datasheet.ciiva.com/7696/1854511-7696293.pdf?src-supplier=Element14, ComponentLink12Description=https://datasheet.ciiva.com/7696/1854511-7696295.pdf?src-supplier=Element14, ComponentLink12URL=https://datasheet.ciiva.com/7696/1854511-7696295.pdf?src-supplier=Element14, ComponentLink13Description=https://datasheet.ciiva.com/7696/1446014-7696296.pdf?src-supplier=Element14, ComponentLink13URL=https://datasheet.ciiva.com/7696/1446014-7696296.pdf?src-supplier=Element14, ComponentLink14Description=https://datasheet.ciiva.com/7696/1923792-7696431.pdf?src-supplier=Element14, ComponentLink14URL=https://datasheet.ciiva.com/7696/1923792-7696431.pdf?src-supplier=Element14, ComponentLink15Description=https://datasheet.ciiva.com/29244/458306-da-01-de-kondensator-10uf-3216-10pr-16v-85c-29244588.pdf?src-supplier=Conrad, ComponentLink15URL=https://datasheet.ciiva.com/29244/458306-da-01-de-kondensator-10uf-3216-10pr-16v-85c-29244588.pdf?src-supplier=Conrad, Item Type=Capacitor, Manufacturer Part Number=T491A106K016AT, Pricing 1="1=0.34, 10=0.214, 50=0.214, 100=0.163, 1000=0.118, 10000=0.096 (USD)", RoHS=Yes, Stock 1=340138, Supplier 1=Mouser
C11 C18 C24: library part CC0603KRX5R9BB104, "CAP CER 0.1UF 50V X5R 0603", Case Code (Imperial)=0603, Case Code (Metric)=1608, Dielectric=X5R, LCSC Part Number=C110022, Manufacturer=Yageo, Max Operating Temperature=85°C, Min Operating Temperature=-55°C, Package Quantity=4000, Supplier Part Number 1=311-4046-1-ND, Tolerance=10%, Voltage Rating=50V, Capacitance=100nF, Case/Package=0603, Category="Ceramic Capacitors", ComponentLink1Description=http://www.mouser.com/ds/2/447/Yageo_UPY-GP_NP0_16V-to-50V_9-358835.pdf?src-supplier=Mouser, ComponentLink1URL=http://www.mouser.com/ds/2/447/Yageo_UPY-GP_NP0_16V-to-50V_9-358835.pdf?src-supplier=Mouser, ComponentLink2Description=https://www.yageo.com/upload/media/product/productsearch/datasheet/mlcc/UPY-GPHC_X5R_4V-to-50V_26.pdf?src-supplier=Digi-Key, ComponentLink2URL=https://www.yageo.com/upload/media/product/productsearch/datasheet/mlcc/UPY-GPHC_X5R_4V-to-50V_26.pdf?src-supplier=Digi-Key, ComponentLink3Description=http://www.yageo.com/exep/pages/download/literatures/ProductSelectionGuide%202014_Final_2.pdf?src-supplier=Digi-Key, ComponentLink3URL=http://www.yageo.com/exep/pages/download/literatures/ProductSelectionGuide%202014_Final_2.pdf?src-supplier=Digi-Key, Halogen Free="Halogen Free", Item Type=Capacitor, Lead Free="Lead Free", Length=0.063inch, Manufacturer Part Number=CC0603KRX5R9BB104, Mount="Surface Mount", Packaging="Tape and Reel", Pricing 1="1=0.10000, 10=0.05200, 50=0.02820, 100=0.02310, 500=0.01648, 1000=0.01294 (USD)", RoHS=Yes, Stock 1=152253, Supplier 1=Digi-Key, Termination=SMD/SMT, Thickness=0.035inch, Voltage Rating (DC)=50V, Weight=7.1E-05oz, Width=0.031inch
C15: library part C1005X5R1H104K050BB, "CAP CER 0.1UF 50V X5R 0402", Capacitance=100nF, Case Code (Imperial)=0402, Case Code (Metric)=1005, Dielectric=X5R, Dielectric Material=Ceramic, LCSC Part Number=C2181865, Manufacturer=TDK, Max Operating Temperature=85°C, Min Operating Temperature=-55°C, Package Quantity=1, Supplier Part Number 1=445-5942-1-ND, Tolerance=10%, Voltage=50V, Case/Package=0402, ComponentLink1Description=https://product.tdk.com/info/en/catalog/spec/mlccspec_commercial_general_midvoltage_en.pdf?src-supplier=Digi-Key, ComponentLink1URL=https://product.tdk.com/info/en/catalog/spec/mlccspec_commercial_general_midvoltage_en.pdf?src-supplier=Digi-Key, ComponentLink2Description=http://www.tdk.co.jp/tefe02/e413_c.pdf?src-supplier=Future+Electronics, ComponentLink2URL=http://www.tdk.co.jp/tefe02/e413_c.pdf?src-supplier=Future+Electronics, ComponentLink3Description=https://www.verical.com/server-webapp/html/getDatasheet?partID=743571&src-supplier=Verical, ComponentLink3URL=https://www.verical.com/server-webapp/html/getDatasheet?partID=743571&src-supplier=Verical, ComponentLink4Description=http://www.tdk.co.jp/tefe02/e412_c.pdf?src-supplier=Avnet+Europe, ComponentLink4URL=http://www.tdk.co.jp/tefe02/e412_c.pdf?src-supplier=Avnet+Europe, Construction=Flat, Depth=0.5mm, Height=0.5mm, Item Type=Capacitor, Lead Free="Lead Free", Length=1mm, Manufacturer Part Number=C1005X5R1H104K050BB, Mount="Surface Mount", Packaging="Tape and Reel", Pricing 1="1=0.12, 10=0.09, 50=0.049, 100=0.04, 500=0.02858, 1000=0.02245, 2500=0.02041, 5000=0.01878 (USD)", Radiation Hardening=No, REACH SVHC="No SVHC", Resistor Type=Ceramic, RoHS Compliant=Yes, Series=C, Stock 1=1455182, Supplier 1=Digi-Key, Termination=SMD/SMT, Thickness=0.022inch, Voltage Rating=50V, Voltage Rating (DC)=50V, Weight=2.3E-05oz, Width=0.02inch
C16: library part CC0603ZRY5V9BB104, "CAP CER 0.1UF 50V Y5V 0603", Capacitance=100nF, Case Code (Imperial)=0603, Case Code (Metric)=1608, Dielectric=Y5V, LCSC Part Number=C106221, Manufacturer=Yageo, Max Operating Temperature=85°C, Min Operating Temperature=-30°C, Package Quantity=1, Supplier Part Number 1=311-1343-1-ND, Tolerance=80%, Voltage=50V, Case/Package=0603, ComponentLink1Description=http://www.yageo.com/documents/recent/UPY-GPHC_Y5V_6.3V-to-50V_8.pdf?src-supplier=Digi-Key, ComponentLink1URL=http://www.yageo.com/documents/recent/UPY-GPHC_Y5V_6.3V-to-50V_8.pdf?src-supplier=Digi-Key, ComponentLink2Description=http://www.yageo.com/documents/recent/UPY-GPHC_Y5V_6.3V-to-50V_5.pdf?src-supplier=Avnet+Europe, ComponentLink2URL=http://www.yageo.com/documents/recent/UPY-GPHC_Y5V_6.3V-to-50V_5.pdf?src-supplier=Avnet+Europe, ComponentLink3Description=https://www.verical.com/server-webapp/html/getDatasheet?partID=403611&src-supplier=Verical, ComponentLink3URL=https://www.verical.com/server-webapp/html/getDatasheet?partID=403611&src-supplier=Verical, ComponentLink4Description=http://www.mouser.com/ds/2/447/Yageo_UPY-GP_NP0_16V-to-50V_9-358835.pdf?src-supplier=Mouser, ComponentLink4URL=http://www.mouser.com/ds/2/447/Yageo_UPY-GP_NP0_16V-to-50V_9-358835.pdf?src-supplier=Mouser, ComponentLink5Description=http://www.farnell.com/datasheets/1132289.pdf?src-supplier=Element14, ComponentLink5URL=http://www.farnell.com/datasheets/1132289.pdf?src-supplier=Element14, Composition=Ceramic, Depth=0.8mm, Halogen Free="Halogen Free", Height=0.8mm, Item Type=Capacitor, Lead Free="Lead Free", Length=1.6mm, Manufacturer Part Number=CC0603ZRY5V9BB104, Mount="Surface Mount", Number of Pins=2, Packaging="Tape and Reel", Pricing 1="1=0.1, 10=0.075, 100=0.0334, 500=0.02386, 1000=0.01874 (USD)", Radiation Hardening=No, REACH SVHC="No SVHC", Stock 1=15000880, Supplier 1=Digi-Key, Termination=SMD/SMT, Thickness=0.035inch, Voltage Rating=50V, Voltage Rating (DC)=50V, Width=0.031inch
C17 C19: library part CC0603KRX5R7BB475, "CAP CER 4.7UF 16V X5R 0603", Case Code (Imperial)=0603, Case Code (Metric)=1608, Dielectric=X5R, LCSC Part Number=C277476, Manufacturer=Yageo, Max Operating Temperature=85°C, Min Operating Temperature=-55°C, Resistor Type=Ceramic, Supplier Part Number 1=311-1785-1-ND, Tolerance=10%, Voltage Rating=16V, Capacitance=4.7uF, Case/Package=0603, Category="Ceramic Capacitors", ComponentLink1Description=http://www.mouser.com/ds/2/447/UPY-GPHC_X5R_4V-to-50V_25-1131599.pdf?src-supplier=Mouser, ComponentLink1URL=http://www.mouser.com/ds/2/447/UPY-GPHC_X5R_4V-to-50V_25-1131599.pdf?src-supplier=Mouser, ComponentLink2Description=http://www.yageo.com/documents/recent/UPY-GPHC_X5R_4V-to-50V_25.pdf?src-supplier=Digi-Key, ComponentLink2URL=http://www.yageo.com/documents/recent/UPY-GPHC_X5R_4V-to-50V_25.pdf?src-supplier=Digi-Key, Depth=0.8mm, Halogen Free="Halogen Free", Height=0.8mm, Item Type=Capacitor, Lead Free="Lead Free", Length=1.6mm, Manufacturer Part Number=CC0603KRX5R7BB475, Mount="Surface Mount", Packaging="Tape and Reel", Pricing 1="1=0.20000, 10=0.13800, 50=0.08280, 100=0.06990, 500=0.04784, 1000=0.04233 (USD)", RoHS=Yes, RoHS Compliant=Yes, Series=CC, Stock 1=547703, Supplier 1=Digi-Key, Termination=SMD/SMT, Thickness=0.037inch, Voltage Rating (DC)=16V, Weight=7.1E-05oz, Width=0.8mm
C20: library part CL10A105KB8NNNC, "CAP CER 1UF 50V X5R 0603", Case Code (Imperial)=0603, Case Code (Metric)=1608, Dielectric=X5R, LCSC Part Number=C15849, Manufacturer=Samsung, Max Operating Temperature=85°C, Min Operating Temperature=-55°C, Tolerance=10%, Voltage Rating=50V, Case/Package=0603, Category="Ceramic Capacitors", ComponentLink1Description=https://datasheet.ciiva.com/26877/getdatasheetpartid-753736-26877879.pdf?src-supplier=Verical, ComponentLink1URL=https://datasheet.ciiva.com/26877/getdatasheetpartid-753736-26877879.pdf?src-supplier=Verical, Depth=0.8mm, Item Type=Capacitor, Length=1.6mm, Manufacturer Part Number=CL10A105KB8NNNC, Material=4241ConductorMaterial, Mounting Technology="Surface Mount", Packaging="Tape and Reel", Pricing="4000=0.01632, 8000=0.01595, 16000=0.01557, 24000=0.0152, 32000=0.01482 (USD)", Radiation Hardening=No, RoHS=Yes, RoHS Compliant=Yes, Series=CL, Stock=780446, Supplier=Avnet, Supplier Part Number=CL10A105KB8NNNC, Voltage Rating (DC)=50V
C21: library part TCC0603X5R105M250CT, "1uF 25V X5R ±20% 0603 Multilayer Ceramic Capacitors MLCC - SMD/SMT ROHS", LCSC Part Number=C6266891, Manufacturer=CCTC, ComponentLink1Description=LCSC, ComponentLink1URL=https://www.lcsc.com/product-detail/Multilayer-Ceramic-Capacitors-MLCC-SMD-SMT_CCTC-TCC0603X5R105M250CT_C6266891.html, Item Type=Capacitor, Manufacturer Part Number=TCC0603X5R105M250CT
C25 C26: library part CL10C220JB8NNNC, "CAP CER 22PF 50V C0G/NP0 0603", Case/Package=0603, Dielectric=C0G, LCSC Part Number=C1653, Manufacturer=Samsung, Max Operating Temperature=125°C, Min Operating Temperature=-55°C, Tolerance=5%, Voltage=50V, ComponentLink1Description=https://datasheet.ciiva.com/25803/cl10c220jb8nnnc-25803014.pdf?src-supplier=Digikey, ComponentLink1URL=https://datasheet.ciiva.com/25803/cl10c220jb8nnnc-25803014.pdf?src-supplier=Digikey, ComponentLink2Description=https://datasheet.ciiva.com/29198/457135-da-01-en-vs-kondensator-0603-29198750.pdf?src-supplier=Conrad, ComponentLink2URL=https://datasheet.ciiva.com/29198/457135-da-01-en-vs-kondensator-0603-29198750.pdf?src-supplier=Conrad, ComponentLink3Description=https://datasheet.ciiva.com/26310/mlcc-catalogdownload2013-eng-26310317.pdf?src-supplier=Distrelec, ComponentLink3URL=https://datasheet.ciiva.com/26310/mlcc-catalogdownload2013-eng-26310317.pdf?src-supplier=Distrelec, ComponentLink4Description=https://datasheet.ciiva.com/16387/cl05b104kq5nnnc-16387334.pdf?src-supplier=Future+Electronics, ComponentLink4URL=https://datasheet.ciiva.com/16387/cl05b104kq5nnnc-16387334.pdf?src-supplier=Future+Electronics, Item Type=Capacitors, Lead Free="Lead Free", Manufacturer Part Number=CL10C220JB8NNNC, Mounting Technology="Surface Mount", Packaging="Tape and Reel", Pins=2NUMBER, RoHS=Yes, RoHS Compliant=Yes, Series=CL, Stock=64000, Supplier=Rs, Voltage Rating=50V, Voltage Rating (DC)=50V
D1: "40V 500mV@2A 2A SMA(DO-214AC) Schottky Barrier Diodes (SBD) ROHS", LCSC Part Number=C2886579, Manufacturer="Guangdong Hottech", Package=SMA(DO-214AC), ComponentLink1Description=LCSC, ComponentLink1URL=https://www.lcsc.com/product-detail/Schottky-Barrier-Diodes-SBD_Guangdong-Hottech-SS24A_C2886579.html, Manufacturer Part Number=SS24A
D2: "DIODE ZENER 6.2V 500MW SOD123", Manufacturer=Diodes, Power Rating=500mW, Supplier Part Number=4181776, Voltage Rating (DC)=6.2V, Category="Zener Diodes", ComponentLink1Description=https://datasheet.ciiva.com/15142/getdatasheetpartid-61110-15142283.pdf?src-supplier=Verical, ComponentLink1URL=https://datasheet.ciiva.com/15142/getdatasheetpartid-61110-15142283.pdf?src-supplier=Verical, ComponentLink2Description=https://datasheet.ciiva.com/27052/1541132-27052413.pdf?src-supplier=Jameco, ComponentLink2URL=https://datasheet.ciiva.com/27052/1541132-27052413.pdf?src-supplier=Jameco, ComponentLink3Description=https://datasheet.ciiva.com/890/ds18010-890520.pdf?src-supplier=Digikey, ComponentLink3URL=https://datasheet.ciiva.com/890/ds18010-890520.pdf?src-supplier=Digikey, ComponentLink4Description=https://datasheet.ciiva.com/890/ds18010-890521.pdf?src-supplier=Digikey, ComponentLink4URL=https://datasheet.ciiva.com/890/ds18010-890521.pdf?src-supplier=Digikey, ComponentLink5Description=https://datasheet.ciiva.com/890/ds18010-890522.pdf?src-supplier=Digikey, ComponentLink5URL=https://datasheet.ciiva.com/890/ds18010-890522.pdf?src-supplier=Digikey, Lead Free=5697LeadFree, Manufacturer Part Number=MMSZ5234B-7-F, Pricing="3000=0.0211, 9000=0.0203, 30000=0.0195, 60000=0.0191, 120000=0.0183 (USD)", RoHS=Yes, Stock=81000, Supplier="Future Electronics"
D3: "DIODE GEN PURP 100V 300MA SOD123", Average Rectified Current=300mA, Current Rating=150mA, Forward Voltage=1.25V, LCSC Part Number=C83528, Manufacturer=Diodes, Max Forward Surge Current (Ifsm)=2A, Max Operating Temperature=150°C, Max Repetitive Reverse Voltage (Vrrm)=100V, Max Reverse Current=1uA, Min Operating Temperature=-65°C, Package Quantity=3000, Power Dissipation=400mW, Supplier Part Number 1=7634694, Voltage Rating (DC)=75V, Category="Rectifier Diodes", ComponentLink1Description=https://datasheet.ciiva.com/1179/1915529-1179304.pdf?src-supplier=Element14, ComponentLink1URL=https://datasheet.ciiva.com/1179/1915529-1179304.pdf?src-supplier=Element14, ComponentLink2Description=https://datasheet.ciiva.com/22695/1915529-22695239.pdf?src-supplier=Element14, ComponentLink2URL=https://datasheet.ciiva.com/22695/1915529-22695239.pdf?src-supplier=Element14, ComponentLink3Description=https://datasheet.ciiva.com/8300/ds30086-8300392.pdf?src-supplier=Avnet, ComponentLink3URL=https://datasheet.ciiva.com/8300/ds30086-8300392.pdf?src-supplier=Avnet, ComponentLink4Description=https://datasheet.ciiva.com/15219/getdatasheetpartid-110030-15219548.pdf?src-supplier=Verical, ComponentLink4URL=https://datasheet.ciiva.com/15219/getdatasheetpartid-110030-15219548.pdf?src-supplier=Verical, ComponentLink5Description=https://datasheet.ciiva.com/8303/ds30086-8303197.pdf?src-supplier=Avnet, ComponentLink5URL=https://datasheet.ciiva.com/8303/ds30086-8303197.pdf?src-supplier=Avnet, ComponentLink6Description=https://datasheet.ciiva.com/911/ds30086-911735.pdf?src-supplier=Digi-Key, ComponentLink6URL=https://datasheet.ciiva.com/911/ds30086-911735.pdf?src-supplier=Digi-Key, ComponentLink7Description=https://datasheet.ciiva.com/911/ds30086-911736.pdf?src-supplier=Digi-Key, ComponentLink7URL=https://datasheet.ciiva.com/911/ds30086-911736.pdf?src-supplier=Digi-Key, ComponentLink8Description=https://datasheet.ciiva.com/911/ds30086-911734.pdf?src-supplier=Digi-Key, ComponentLink8URL=https://datasheet.ciiva.com/911/ds30086-911734.pdf?src-supplier=Digi-Key, ComponentLink9Description=https://datasheet.ciiva.com/4435/ds30086-4435128.pdf?src-supplier=Mouser, ComponentLink9URL=https://datasheet.ciiva.com/4435/ds30086-4435128.pdf?src-supplier=Mouser, Contact Plating=Tin,Matte, Element Configuration=Single, Forward Current=150mA, Height=1.25mm, Item Type=Diode, Lead Free="Lead Free", Length=2.85mm, Manufacturer Part Number=1N4148W-7-F, Max Reverse Voltage (DC)=100V, Max Surge Current=2A, Mounting Technology="Surface Mount", Output Current=150mA, Packaging="Tape and Reel", Peak Non-Repetitive Surge Current=2A, Pins=2, Polarity=Standard, Power Rating=400mW, Pricing 1="3000=0.01840, 12000=0.01760, 45000=0.01690, 120000=0.01640, 300000=0.01560 (USD)", Radiation Hardening=No, Reach SVHC Compliant=Yes, Recovery Time=4ns, Reverse Recovery Time=4ns, Reverse Recovery Time-Max=4ns, RoHS=Yes, RoHS Compliant=Yes, Series=-, Stock 1=32931000, Supplier 1="Future Electronics", Voltage=100V, Weight=0.000353oz, Width=1.7mm
D4 D5 D6 D7 D8 D9 D12 D13 D14: "5V 10V 3.3V Bi-Directional SOD-882 ESD Protection Devices ROHS", LCSC Part Number=C172409, Manufacturer=LRC, Package=SOD-882, ComponentLink1Description=LCSC, ComponentLink1URL=https://www.lcsc.com/product-detail/span-style-background-color-ff0-ESD-span-Protection-Devices_LRC-LESD8D3-3CAT5G_C172409.html, Item Type="Protection Device", Manufacturer Part Number=LESD8D3.3CAT5G
D10: "DIODE ZENER 3.3V 200MW SOD323F", Forward Voltage=1V, LCSC Part Number=C2978865, Manufacturer="ON Semiconductor / Fairchild", Max Operating Temperature=150°C, Max Power Dissipation=200mW, Max Reverse Leakage Current=4.5uA, Min Operating Temperature=-65°C, Package Quantity=1, Supplier Part Number 1=MM3Z3V3BCT-ND, Test Current=5mA, Tolerance=2%, Working Voltage=3.3V, ComponentLink1Description=http://www.onsemi.com/pub/Collateral/MM3Z9V1B-D.pdf?src-supplier=Digi-Key, ComponentLink1URL=http://www.onsemi.com/pub/Collateral/MM3Z9V1B-D.pdf?src-supplier=Digi-Key, ComponentLink2Description=http://www.mouser.com/ds/2/149/MM3Z3V3B-187166.pdf?src-supplier=Mouser, ComponentLink2URL=http://www.mouser.com/ds/2/149/MM3Z3V3B-187166.pdf?src-supplier=Mouser, ComponentLink3Description=https://www.fairchildsemi.com/datasheets/MM/MM3Z9V1B.pdf?src-supplier=Avnet, ComponentLink3URL=https://www.fairchildsemi.com/datasheets/MM/MM3Z9V1B.pdf?src-supplier=Avnet, ComponentLink4Description=http://www.farnell.com/datasheets/1706525.pdf?src-supplier=Element14, ComponentLink4URL=http://www.farnell.com/datasheets/1706525.pdf?src-supplier=Element14, Element Configuration=Single, Height=1mm, Impedance=89R, Item Type=Diode, Lead Free="Lead Free", Length=1.3mm, Manufacturer Part Number=MM3Z3V3B, Mount="Surface Mount", Number of Pins=2, Packaging="Tape and Reel", Peak Reverse Current=4.5uA, Power Dissipation=200mW, Pricing 1="1=0.22, 10=0.18, 100=0.0956, 500=0.06288, 1000=0.04276 (USD)", Radiation Hardening=No, REACH SVHC="No SVHC", Stock 1=473644, Supplier 1=Digi-Key, Voltage Tolerance=2%, Weight=0.0276g, Width=1.7mm, Zener Voltage=3.3V
D11: "DIODE SCHOTTKY 40V 250MA SOD323", LCSC Part Number=C152519, Manufacturer="ON Semiconductor", Reverse Voltage=40V, ComponentLink1Description=https://datasheet.ciiva.com/915/nsr0240h-d-915416.pdf?src-supplier=Digikey, ComponentLink1URL=https://datasheet.ciiva.com/915/nsr0240h-d-915416.pdf?src-supplier=Digikey, ComponentLink2Description=https://datasheet.ciiva.com/915/nsr0240h-d-915417.pdf?src-supplier=Digikey, ComponentLink2URL=https://datasheet.ciiva.com/915/nsr0240h-d-915417.pdf?src-supplier=Digikey, ComponentLink3Description=https://datasheet.ciiva.com/915/nsr0240h-d-915418.pdf?src-supplier=Digikey, ComponentLink3URL=https://datasheet.ciiva.com/915/nsr0240h-d-915418.pdf?src-supplier=Digikey, ComponentLink4Description=https://datasheet.ciiva.com/16396/nsr0240h-d-16396521.pdf?src-supplier=Future+Electronics, ComponentLink4URL=https://datasheet.ciiva.com/16396/nsr0240h-d-16396521.pdf?src-supplier=Future+Electronics, Item Type=Diode, Manufacturer Part Number=NSR0240HT1G, Pricing="1=0.272, 25=0.186, 50=0.139, 100=0.091, 250=0.084 (USD)", RoHS=Yes, Stock=6655, Supplier=Avnet
J1: library part C145963, "1x6P SH 1 1mm 6 SMD,P=1mm Wire To Board / Wire To Wire Connector ROHS", Manufacturer=BOOMELE, Package=SMD,P=1mm, ComponentLink1Description=LCSC, ComponentLink1URL=https://www.lcsc.com/product-detail/Wire-To-Board-Wire-To-Wire-Connector_BOOMELE-Boom-Precision-Elec-C145963_C145963.html, Item Type=Connector, LCSC Part Number=C145963, Manufacturer Part Number=C145963
J2: "5A 1 16P Female Type-C SMD USB Connectors ROHS", LCSC Part Number=C165948, Manufacturer="Korean Hroparts Elec", ComponentLink1Description=LCSC, ComponentLink1URL=https://www.lcsc.com/product-detail/USB-Connectors_Korean-Hroparts-Elec-TYPE-C-31-M-12_C165948.html, Item Type="USB Connector", Manufacturer Part Number=TYPE-C-31-M-12
J3: "Slide Lock 40P Bottom Contact Surface Mount, Right Angle 0.5mm SMD,P=0.5mm,Surface Mount,Right Angle FFC, FPC (Flat Flexible) Connector Assemblies ROHS", LCSC Part Number=C262572, Manufacturer=JUSHUO, ComponentLink1Description=LCSC, ComponentLink1URL=https://www.lcsc.com/product-detail/C262572.html?s_z=n_AFC07-S40FCA-00, Item Type="FFC/FPC Connector", Manufacturer Part Number=AFC07-S40FCA-00, RoHS=No, Supplier=LCSC
J4: "1x12P 12P PicoBlade(MX 1.25) Tin 12 -25℃~+85℃ 2A 1 1.25mm Brass Surface Mount,Vertical SMD,P=1.25mm Wire To Board Connector ROHS", LCSC Part Number=C2937190, Manufacturer=HCTL, Package=SMD,P=1.25mm, ComponentLink1Description=LCSC, ComponentLink1URL=https://lcsc.com/product-detail/Wire-To-Board-Connector_HCTL-HC-1-25-12PLT_C2937190.html?s_z=n_1.25-12plt, Item Type="Wire To Board Connector", Manufacturer Part Number=HC-1.25-12PLT